# Altium PCB PCB1.PcbDoc (part 2 of 4)
Units mm, origin at the board's own origin, x right, y up, seen from the top; angles counter-clockwise.
Board outline 134.12 x 116.9 mm, 4 copper layers (Top Layer, Layer 1, Layer 2, Bottom Layer), stack 1.312 mm thick; 317 components, 155 nets, 807 pads, 898 vias.
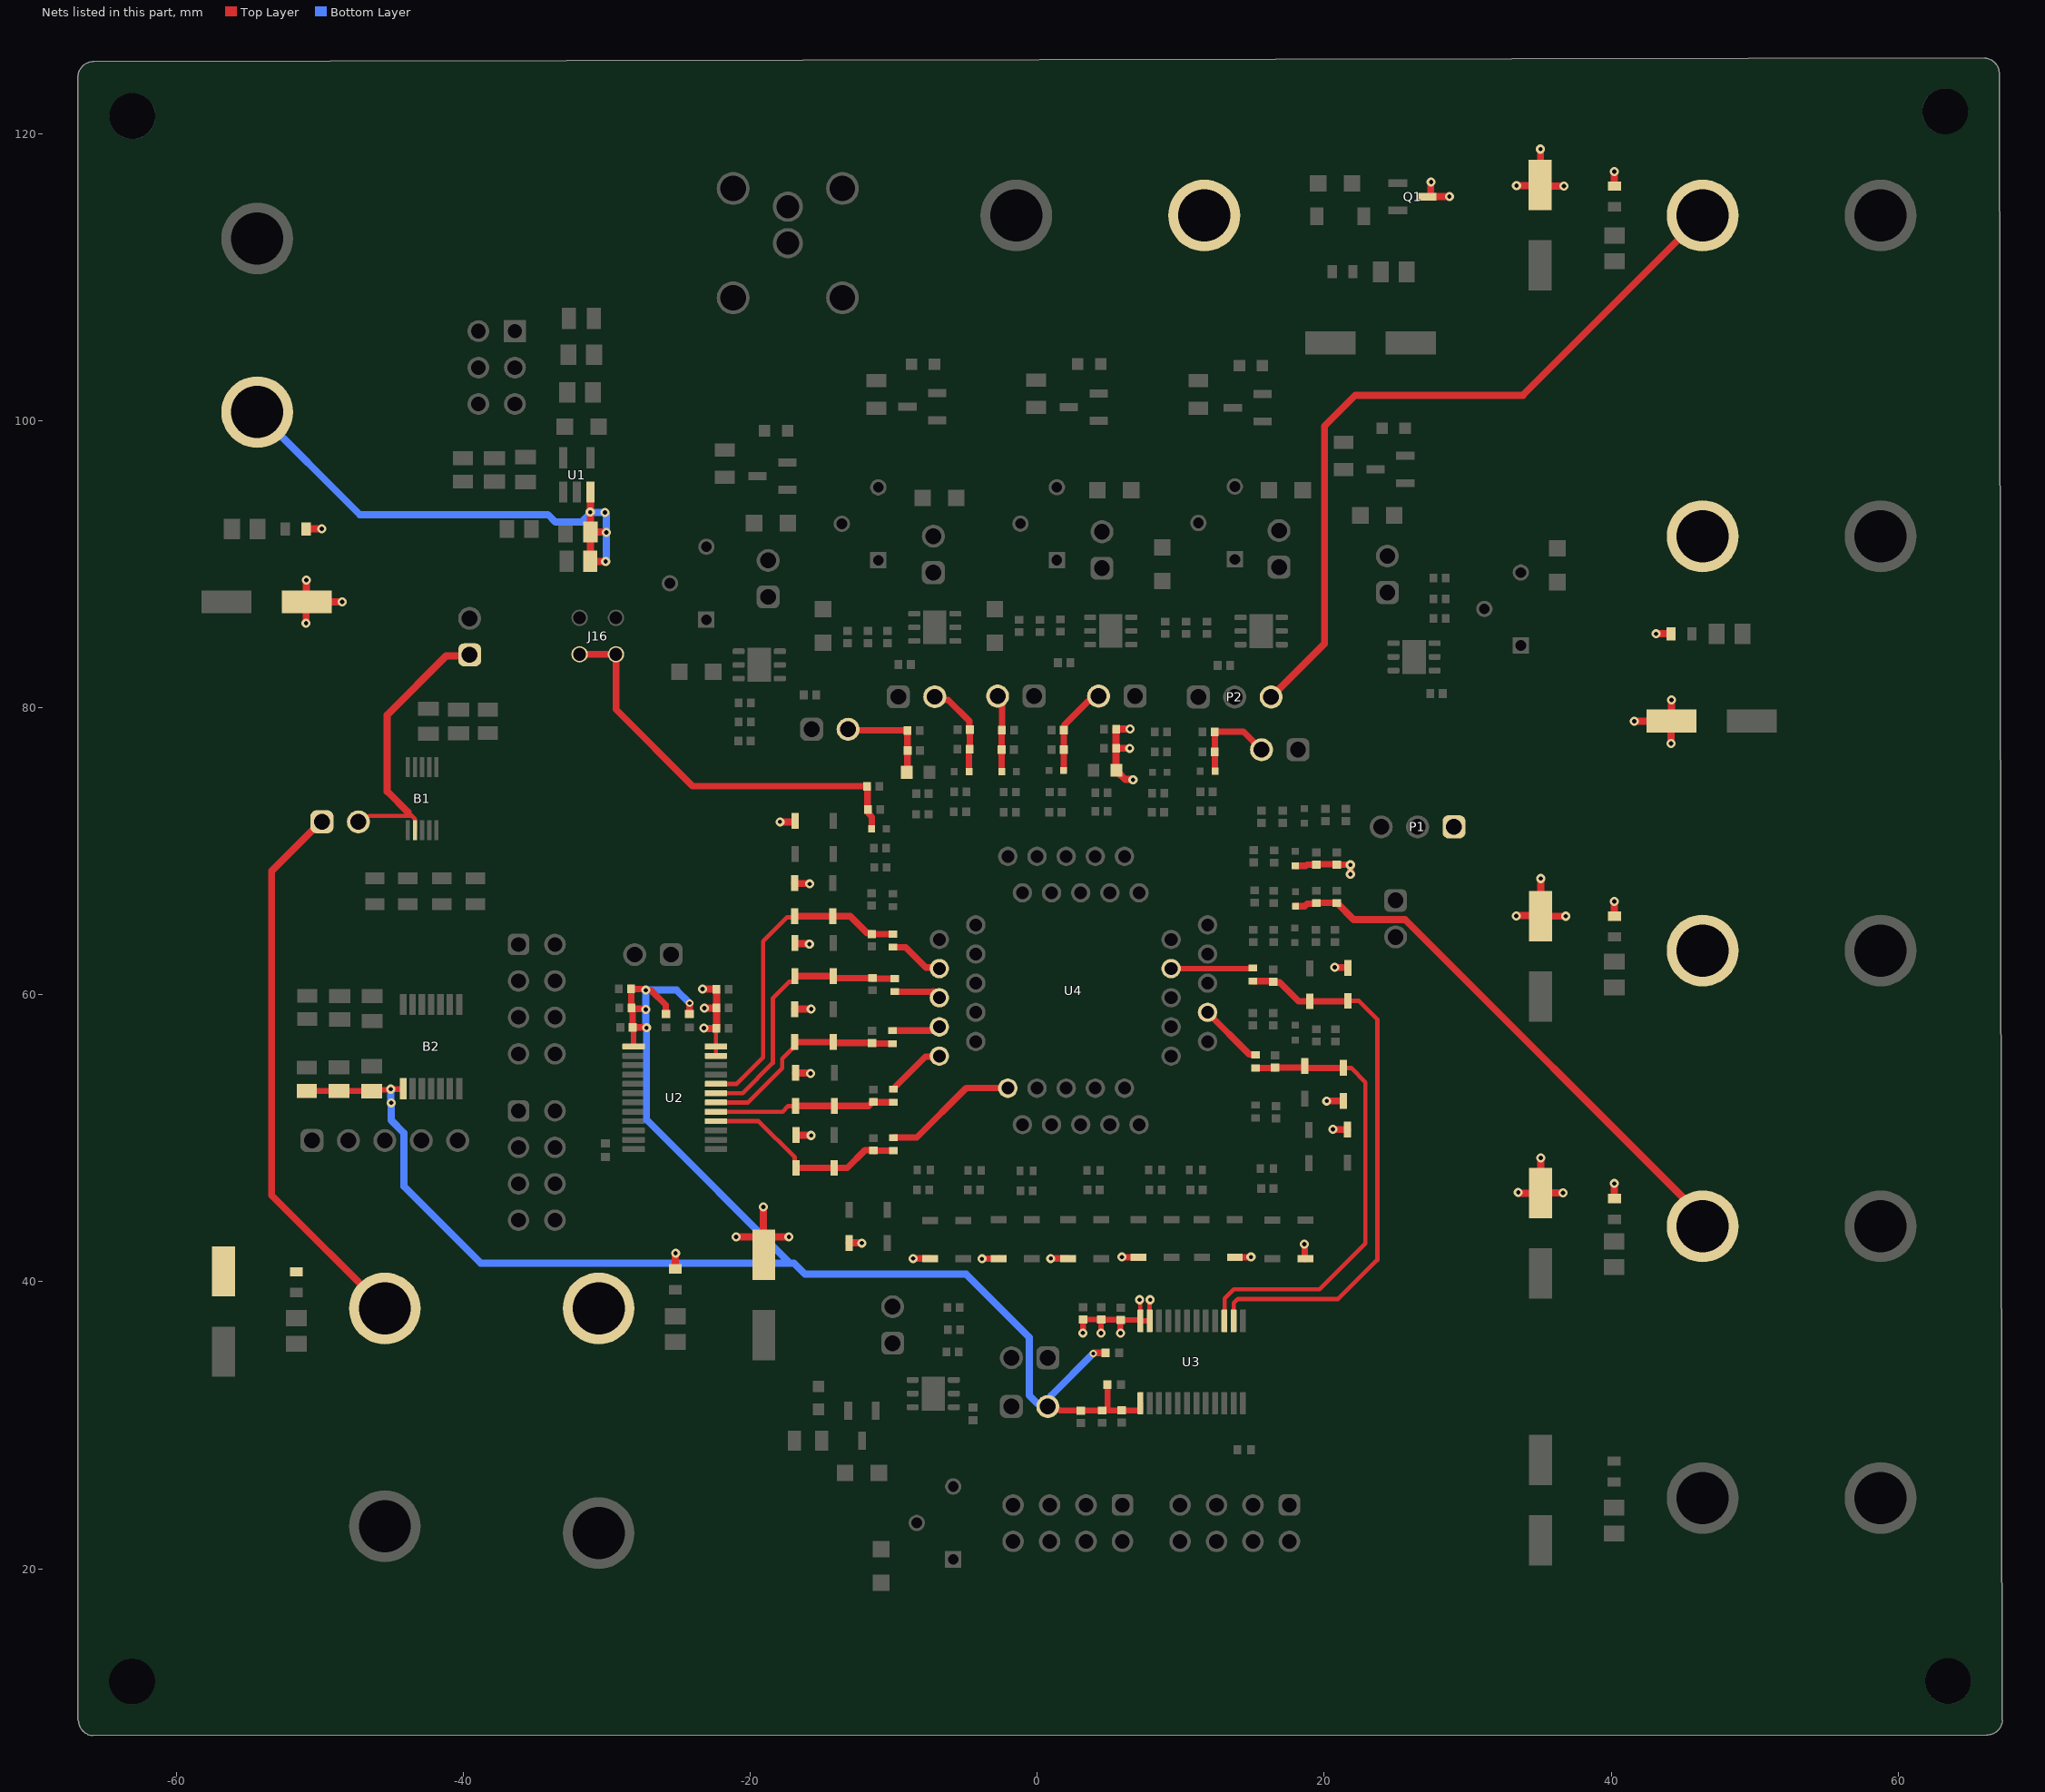
[diagram p4: the nets of this part, all layers, seen from the top]

## Part data
B1: "4 Channel, 500 ksps to 1 Msps, 12-Bit A/D Converter", Manufacturer_Name="Texas Instruments", Manufacturer_Part_Number=ADC124S101CIMM/NOPB, Mouser Part Number=926-AD124S101CIMMNPB, Datasheet Link=http://www.ti.com/lit/ds/symlink/adc124s101.pdf, Geometry.Height=1.1mm, Mouser Price/Stock=https://www.mouser.co.uk/ProductDetail/Texas-Instruments/ADC124S101CIMM-NOPB?qs=7X5t%252BdzoRHD7V7sCz8DzxQ%3D%3D
B2: "Voltage Level Translator Unidirectional 1 Circuit 4 Channel 200Mbps TSSOP-14", Manufacturer_Name="Texas Instruments", Mouser Part Number=595-TXU0304QPWRQ1, Datasheet Link=https://www.ti.com/lit/ds/symlink/txu0304-q1.pdf, Geometry.Height=1.2mm, Manufacturer_Part_Number=TXU0304QPWRQ1, Mouser Price/Stock=https://www.mouser.co.uk/ProductDetail/Texas-Instruments/TXU0304QPWRQ1?qs=QNEnbhJQKvZXfjMNvwmKIA%3D%3D
C1 C5 C8 C80 C81 C105: "100 pF +/-10% 1000V (1kV) Ceramic Capacitor C0G, NP0 0805 (2012 Metric)", Manufacturer_Name="Kyocera AVX", Mouser Part Number=581-0805CA101KAT2A, Datasheet Link=https://datasheets.kyocera-avx.com/AVX-HV_MLCC.pdf, Geometry.Height=0.94mm, Manufacturer_Part_Number=0805CA101KAT2A, Mouser Price/Stock=https://www.mouser.co.uk/ProductDetail/KYOCERA-AVX/0805CA101KAT2A?qs=ZBeOGGPQgEHtR%2FQeWT8jmQ%3D%3D
C2 C4 C7 C10 C11: "Multilayer Ceramic Capacitors MLCC - SMD/SMT 0805 0.1uF 50volts X7R 10%", Manufacturer_Name=Vishay, Mouser Part Number=77-VJ0805Y104KXAMR, Datasheet Link=http://www.vishay.com/docs/45226/vj31xrohsautomlcc.pdf, Geometry.Height=1.45mm, Manufacturer_Part_Number=VJ0805Y104KXAMR, Mouser Price/Stock=https://www.mouser.co.uk/ProductDetail/Vishay-Vitramon/VJ0805Y104KXAMR?qs=iPOr8XgPdiSpDWrmTedxnA%3D%3D
C3 C6 C9 C12: "1 µF ±10% 10V Ceramic Capacitor X7R 0805 (2012 Metric)", Manufacturer_Name=Vishay, Mouser Part Number=77-VJ0805Y105KXQTBC, Datasheet Link=https://www.vishay.com/docs/28548/vjw1bcbascomseries.pdf, Geometry.Height=1.35mm, Manufacturer_Part_Number=VJ0805Y105KXQTW1BC, Mouser Price/Stock=https://www.mouser.co.uk/ProductDetail/Vishay-Vitramon/VJ0805Y105KXQTW1BC?qs=F2lBERbFaaHnNHh23%2Flzkg%3D%3D
C13 C15 C30 C32 C56 C76 C77 C78 C103: "10 µF ±10% 16V Ceramic Capacitor X5R 0805 (2012 Metric)", Manufacturer_Name=Yageo, Copyright="Copyright (C) 2025 Ultra Librarian. All rights reserved.", Manufacturer_Part_Number=CC0805KRX5R7BB106
C14 C16 C31 C33 C57 C70 C75 C79 C104: library part WCAP-ASLI_6.3X5.5, "100 µF 16 V Aluminum Electrolytic Capacitors Radial, Can - SMD 2000 Hrs @ 105°C", Package=None, Availability=Unavailable, MF="{'manufacturer': u'W\xfcrth Elektronik'}", MP=865080343009, Price=None
C17 C18 C20 C21 C34 C36 C37 C38 C41 C42 C44 C45 C46 C48 C49 C50 C53 C54 C58 C59 C62 C63 C67 C68 C71 C72 C100 C101 C102 C106 C_U183 C_U283 C_U383 C_U483 C_U583 C_U683: "1 µF ±10% 10V Ceramic Capacitor X7S 0402 (1005 Metric)", Package="0402-2 VISHAY", Check_prices=https://www.snapeda.com/parts/VJ0402Y104KXXCW1BC/Vishay/view-part/?ref=eda, MF="Vishay Vitramon", MP=VJ0402Y104KXXCW1BC, SnapEDA_Link=https://www.snapeda.com/parts/VJ0402Y104KXXCW1BC/Vishay/view-part/?ref=snap
C19 C22 C25 C26 C29 C35 C39 C40 C43 C47 C51 C52 C55 C60 C69 C73 C86 C87 C88 C89 C90 C91 C92 C93 C94 C95 C96 C97 C98 C99 C_U184 C_U284 C_U384 C_U484 C_U584 C_U684: "0.1 ÂµF Â±10% 25V Ceramic Capacitor X7R 0402 (1005 Metric)", Package="0402-2 VISHAY", Check_prices=https://www.snapeda.com/parts/VJ0402Y104KXXCW1BC/Vishay/view-part/?ref=eda, MF="Vishay Vitramon", MP=VJ0402Y104KXXCW1BC, SnapEDA_Link=https://www.snapeda.com/parts/VJ0402Y104KXXCW1BC/Vishay/view-part/?ref=snap
C23 C24 C27 C28 C_U164 C_U165 C_U166 C_U167 C_U185 C_U264 C_U265 C_U266 C_U267 C_U285 C_U364 C_U365 C_U366 C_U367 C_U385 C_U464 C_U465 C_U466 C_U467 C_U485 C_U585 C_U685: "100 pF ±5% 100V Ceramic Capacitor C0G, NP0 0402 (1005 Metric)", Package=None, Availability=Unavailable, MF="{'manufacturer': u'KEMET'}", MP=C0402C101J1GACAUTO, Price=None
C61: "4.7 pF ±0.25pF 100V Ceramic Capacitor C0G, NP0 0805 (2012 Metric)", Manufacturer_Name=Yageo, Copyright="Copyright (C) 2026 Ultra Librarian. All rights reserved.", Manufacturer_Part_Number=CC0805CRNPO0BN4R7
C74: "22 pF ±5% 200V Ceramic Capacitor C0G, NP0 0805 (2012 Metric)", Manufacturer_Name=Yageo, Copyright="Copyright (C) 2026 Ultra Librarian. All rights reserved.", Manufacturer_Part_Number=CC0805JRNPOABN220
C_U182 C_U282 C_U382 C_U482 C_U582 C_U682: "SMD capacitor X5R(EIA) with capacitance 4.7uF Tol.20%. Rated voltage 6.3Vdc 85C", Package="1005 Taiyo Yuden", Check_prices=https://www.snapeda.com/parts/GRT155R60J475ME13J/Murata/view-part/?ref=eda, MF=Murata, MP=GRT155R60J475ME13J, SnapEDA_Link=https://www.snapeda.com/parts/GRT155R60J475ME13J/Murata/view-part/?ref=snap
D10: "Zener Diode 6.2 V 500 mW ±5% Surface Mount SOD-123", Package=None, Availability=Unavailable, MF="{'manufacturer': u'onsemi'}", MP=SZMMSZ5234BT1G, Price=None
D_U11 D_U12 D_U13 D_U14 D_U15 D_U16 D_U17 D_U18 D_U21 D_U22 D_U23 D_U24 D_U25 D_U26 D_U27 D_U28 D_U31 D_U32 D_U33 D_U34 D_U35 D_U36 D_U37 D_U38 D_U41 D_U42 D_U43 D_U44 D_U45 D_U46 D_U47 D_U48: "Small Signal Schottky Diodes", Manufacturer_Name=MCC, Mouser Part Number=833-BAT43WS-TP, Datasheet Link=https://www.mccsemi.com/pdf/Products/BAT42WS-BAT43WS(SOD-323).pdf, Geometry.Height=1.15mm, Manufacturer_Part_Number=BAT43WS-TP, Mouser Price/Stock=https://www.mouser.co.uk/ProductDetail/Micro-Commercial-Components-MCC/BAT43WS-TP?qs=Vo7e0yZOYdELUvvmcALzzg%3D%3D
D_U19 D_U29 D_U39 D_U49 D_U59 D_U69: "0603, Green Typ.(@20mA): 520nm, 430mcd, 3.2V, 140Â° InGaN", Package="0603 WÃ¼rth Elektronik", Check_prices=https://www.snapeda.com/parts/150060GS75000/Wurth+Electronics/view-part/?ref=eda, MF="Wurth Electronics", MP=150060GS75000, SnapEDA_Link=https://www.snapeda.com/parts/150060GS75000/Wurth+Electronics/view-part/?ref=snap
J1 J3 J28 J29 J30 J31 J_U126 J_U127 J_U226 J_U227 J_U326 J_U327 J_U426 J_U427 J_U526 J_U527 J_U626 J_U627: Package=None, Availability=Unavailable, Price=None
  J1: MF="{'manufacturer': u'W\xfcrth Elektronik'}", MP=61300511121
  J3 J28 J29 J30 J31 J_U126 J_U127 J_U226 J_U227 J_U326 J_U327 J_U426 J_U427 J_U526 J_U527 J_U626 J_U627: ComponentLink1Description="Digikey link", ComponentLink1URL=https://www.digikey.com/en/products/detail/w%C3%BCrth-elektronik/61300211121/4846823, MF="{'manufacturer': u'Wurth Electronics'}", MP=61300211121
J2: "Description", Manufacturer_Name="Cinch Connectivity Solutions", Copyright="Copyright (C) 2025 Ultra Librarian. All rights reserved.", Manufacturer_Part_Number=CBJ70, RefDes=RefDes, Type=Type
J4 J5 J10 J11 J12 J13 J14 J15 J17 J18 J19 J20 J21 J22 J23 J25 J32 J33: "Banana Jack Connector Miniature Solder", Manufacturer_Name="Keystone Electronics", Mouser Part Number=534-476-4, Datasheet Link=https://www.digikey.com/en/products/detail/keystone-electronics/476-4/318477, Geometry.Height=6.66mm, Manufacturer_Part_Number=476-4, Mouser Price/Stock=https://www.mouser.co.uk/ProductDetail/Keystone-Electronics/476-4?qs=w4ABFRoM%2FL8IE7UmBO5PGw%3D%3D
J6 J7 J8 J9: "WR-PHD 2.54 MM DUAL SOCKET HEADE", Package=None, Check_prices=https://www.snapeda.com/parts/61300821821/W%25C3%25BCrth+Elektronik+Midcom/view-part/?ref=eda, MF="WÃ¼rth Elektronik", MP=61300821821, SnapEDA_Link=https://www.snapeda.com/parts/61300821821/W%25C3%25BCrth+Elektronik+Midcom/view-part/?ref=snap
J16: "Connector Header Through Hole 4 position 0.100\" (2.54mm)", Manufacturer_Name=Sullins, Copyright="Copyright (C) 2026 Ultra Librarian. All rights reserved.", Manufacturer_Part_Number=PBC02DAAN, RefDes=RefDes, Type=Type
J24: "Connector Header Through Hole 6 position 0.100\" (2.54mm)", Manufacturer_Name="Amphenol ICC", Copyright="Copyright (C) 2025 Ultra Librarian. All rights reserved.", Manufacturer_Part_Number=67996-206HLF, RefDes=RefDes, Type=Type
P1 P2: "WR-PHD Pin Header, THT, Vertical, pitch 2.54mm, 1 Row, 3P", Contact Resistance=20mOhm, Manufacturer="Wurth Elektronik", Operating Temperature Max=105°C, Operating Temperature Min=-40°C, Rated Current=3A, Withstanding Voltage=500V, Working Voltage=250V, Category="Board-to-Board Connectors", ComponentLink1Description="Website Link", ComponentLink1URL=https://www.we-online.com/redexpert/article/61300311121?ad, ComponentLink2Description="Datasheet Link", ComponentLink2URL=https://www.we-online.com/redexpert/spec/61300311121?ad, Gender="Pin Header", Manufacturer Part Number=61300311121, Match Code=WR-PHD, Mount="Through Hole", Number of Pins=3, Number of Rows=1, Orientation=Vertical, Packaging=Bag, Pitch=2.54mm
Q1: "P-CHANNEL 40-V (D-S) MOSFET", Manufacturer_Name=Vishay, Copyright="Copyright (C) 2025 Ultra Librarian. All rights reserved.", Manufacturer_Part_Number=SQ2319CES-T1_GE3
Q_U12 Q_U22 Q_U32 Q_U42 Q_U52 Q_U62: "N-Channel 60 V 115mA (Ta) 200mW (Ta) Surface Mount SOT-23-3", Manufacturer_Name=onsemi, Copyright="Copyright (C) 2026 Ultra Librarian. All rights reserved.", Manufacturer_Part_Number=2N7002
R1 R_U131 R_U231 R_U331 R_U431 R_U531 R_U631: "RES SMD 300K OHM 0.1% 1/8W 0805", Package=None, Availability=Unavailable, ComponentLink1Description="Digikey link", ComponentLink1URL=https://www.digikey.com/en/products/detail/panasonic-industry/ERA-6AEB304V/1465808, MP=ERA6AEB304V, Price=None
R2: "20 Ohms ±0.5% 0.125W, 1/8W Chip Resistor 0805 (2012 Metric) Thin Film", Manufacturer_Name=Yageo, Copyright="Copyright (C) 2026 Ultra Librarian. All rights reserved.", Manufacturer_Part_Number=RT0805DRE0720RL
R3 R4 R5 R6: "RES 33 OHM 5% 1/8W 0805", Manufacturer_Name="Stackpole International", Copyright="Copyright (C) 2026 Ultra Librarian. All rights reserved.", Manufacturer_Part_Number=RMCF0805JT33R0
R8 R10 R11 R12 R13 R14 R15 R16 R18 R19 R20: "100 Ohms ±0.1% 0.063W, 1/16W Chip Resistor 0402 (1005 Metric) Automotive AEC-Q200 Thin Film", Package=None, Availability=Unavailable, MP=ERA2AEB101X, Price=None
R9 R17: "5 Ohms ±1% 0.4W Chip Resistor 0603 (1608 Metric) Automotive AEC-Q200, Current Sense Thin Film", Manufacturer_Name="Stackpole International", Copyright="Copyright (C) 2025 Ultra Librarian. All rights reserved.", Manufacturer_Part_Number=CSRT0603FT5R00, Type="Chip Resistor - Surface Mount"
R21 R22 R23 R24 R25 R26: "10 kOhms ±0.5% 0.063W, 1/16W Chip Resistor 0402 (1005 Metric) Automotive AEC-Q200 Thin Film", Package="0402 Yageo", Check_prices=https://www.snapeda.com/parts/RC0402FR-070RL/Yageo/view-part/?ref=eda, ComponentLink1Description="Digikey link", ComponentLink1URL=https://www.digikey.com/en/products/detail/panasonic-industry/ERA-2AED103X/1706126, MF=Yageo, MP=RC0402FR-070RL, SnapEDA_Link=https://www.snapeda.com/parts/RC0402FR-070RL/Yageo/view-part/?ref=snap
R33: "100 kOhms ±0.1% 0.125W, 1/8W Chip Resistor 0805 (2012 Metric) Automotive AEC-Q200 Thin Film", Package=None, Availability=Unavailable, MP=ERA6AEB104V, Price=None
R34 R35 R36 R37 R38 R39 R40 R41 R42: library part ERA3AEB201V, "200 Ohms ±0.1% 0.1W, 1/10W Chip Resistor 0603 (1608 Metric) Automotive AEC-Q200 Thin Film", Package=None, Availability=Unavailable, MP=ERA3AEB201V, Price=None
R_U17 R_U27 R_U37 R_U47 R_U57 R_U67: "RES SMD 20K OHM 0.1% 1/8W 0805", Package=None, Availability=Unavailable, ComponentLink1Description="Digikey link", ComponentLink1URL=https://www.digikey.com/en/products/detail/panasonic-industry/ERA-6AEB203V/1465780?_gl=1*16ggu6x*_up*MQ..*_gs*MQ..&gclid=CjwKCAjw6f3RBhApEiwAMaCqWWAys7UYOKri6355z56lT8wD9j8kH64REZKYwhM8W5opH-dHb2-LKxoC2UMQAvD_BwE&gclsrc=aw.ds&gbraid=0AAAAADrbLliUt3fRxN84rEH66mf2IHcf7, MP=ERA6AEB203V, Price=None
R_U127 R_U128 R_U129 R_U130 R_U227 R_U228 R_U229 R_U230 R_U327 R_U328 R_U329 R_U330 R_U427 R_U428 R_U429 R_U430: "1.5 kOhms ±0.5% 0.1W, 1/10W Chip Resistor 0402 (1005 Metric) Automotive AEC-Q200 Thin Film", Package=None, Availability=Unavailable, MP=RNCF0402DTE1K50, Price=None
R_U132 R_U232 R_U332 R_U432 R_U532 R_U632: "270 Ohms ±0.1% 0.125W, 1/8W Chip Resistor 0805 (2012 Metric) Thin Film", Package=None, Availability=Unavailable, MP=RT0805BRD07270RL, Price=None
R_U143 R_U243 R_U343 R_U443 R_U543 R_U643: "100 kOhms 0.5W, 1/2W PC Pins Through Hole Trimmer Potentiometer Cermet 25.0 Turn Top Adjustment", Package=None, Availability=Unavailable, MP=3296Y-1-104LF, Price=None
U1: "Precision, zero-crossover, 20-MHz, 0.9-pA Ib, RRIO, CMOS operational amplifier 5-SOT-23 -40 to 125", Manufacturer_Name="Texas Instruments", Copyright="Copyright (C) 2025 Ultra Librarian. All rights reserved.", Manufacturer_Part_Number=OPA320AIDBVT, RefDes=RefDes, Type=Type
U2 U3: "8-bit dual-supply bus transceiver", Package="TSSOP-24 Texas Instruments", Check_prices=https://www.snapeda.com/parts/SN74AXC8T245PWR/Texas+Instruments/view-part/?ref=eda, ComponentLink1Description="Digikey link", ComponentLink1URL=SN74AXC8T245PWR, MF="Texas Instruments", MP=SN74AXC8T245PWR, SnapEDA_Link=https://www.snapeda.com/parts/SN74AXC8T245PWR/Texas+Instruments/view-part/?ref=snap
U4: "40 Input/Output (I/O) and 1.02 Millimeter (mm) Pitch  / Lead Chip Carrier (LCC) Socket with Castellations (live-bug load)"
U_U12 U_U22 U_U32 U_U42 U_U52 U_U62: "Linear Voltage Regulator IC 1 Output 500mA 6-DFN _3x3_", Package="DFN-6 STMicroelectronics", ComponentLink1Description="Digikey link", ComponentLink1URL=https://www.digikey.com/en/products/detail/LD39050PUR/497-8717-1-ND/2039902, Digi-Key_Part_Number=497-8717-1-ND, Digi-Key_Purchase_URL=https://www.digikey.com/product-detail/en/stmicroelectronics/LD39050PUR/497-8717-1-ND/2039902?utm_source=snapeda&utm_medium=aggregator&utm_campaign=symbol, MF=STMicroelectronics, MP=LD39050PUR, SnapEDA_Link=https://www.snapeda.com/parts/LD39050PUR/STMicroelectronics/view-part/493713/?ref=snap

## Free pads (board coordinates)
  round 3.2 hole 3.2 mask-2539.97: 4(-63.075,12.15) 4(-63.05,121.225) 4(63.275,121.55) 4(63.475,12.175)

## Via types
v1: diameter 0.635, hole 0.305, Top Layer to Bottom Layer, 880 vias
v2: diameter 0.508, hole 0.254, Top Layer to Bottom Layer, 17 vias
v3: diameter 0.504, hole 0.254, Top Layer to Bottom Layer, 1 vias

## Nets (pads, with @x,y where several pads share a name; then routed paths per layer and width w, separated by ;. In a path a pad name is that pad's centre, name@x,y a point inside that pad or via, vN(x,y) a via of type N, cw(c..) or ccw(c..) an arc to the next point about the centre after c; other vN are vias at no path point)
+0.3V: C45.2 C46.2 C70.1 J14.1 R12.1 R38.2 | length 44.9
  Top Layer w0.45: R12.1@17.998,66.168 18.643,66.168 18.819,66.344 19.388,66.344 19.461,66.416 20.88,66.416 C45.2@20.88,66.414 ; C45.2@20.875,66.394 C45.2@20.925,66.344
  Top Layer w0.5: C45.2@20.875,66.394 20.9,66.394 22.064,65.23 25.645,65.23 46.225,44.65 J14.1@46.225,43.875 ; v1(33.525,46.225) 33.562,46.225 33.612,46.175 34.964,46.175 35.075,46.286 35.161,46.2 v1(36.65,46.2) ; C70.1@35.075,46.236 35.1,46.261 v1(35.1,48.625) ; v1(40.225,46.85) 40.225,45.85 R38.2@40.275,45.8
+0.05V: C2.2 C33.1 C105.2 J10.1 R36.2 U1.3 | length 45.3
  Top Layer w0.5: v1(-50.95,85.9) -50.95,87.35 C33.1@-50.925,87.375 ; R36.2@-50.95,92.375 -50.95,92.383 -50.871,92.462 -49.862,92.462 v1(-49.85,92.475) ; v1(-50.925,88.9) C33.1@-50.925,87.375 ; C33.1@-50.903,87.375 -48.475,87.375 v1@-48.45,87.4 ; C33.1@-50.85,87.275 -50.925,87.35 C33.1@-50.925,87.375 ; C33.1@-50.8,87.5 C33.1@-50.925,87.375 ; C2.2@-31.275,90.225 -31.25,90.2 C2.2@-31.155,90.2 v1(-30.075,90.2) ; C2.2@-31.225,90.3 -31.142,90.383 C105.2@-31.142,92.208 ; v1@-31.2,93.65 -31.165,93.65 -31.127,93.687 U1.3@-31.127,95.025 ; C105.2@-31.15,92.2 C105.2@-31.142,92.208 ; C105.2@-31.15,92.275 C105.2@-31.14,92.265 ; v1(-31.15,93.625) -31.14,93.615 C105.2@-31.14,92.265 ; C105.2@-31.13,92.25 C105.2@-31.14,92.24 ; v1(-30.025,92.225) -30.038,92.238 -31.113,92.238 C105.2@-31.14,92.265 ; C105.2@-31.142,92.208 -31.14,92.21 C105.2@-31.14,92.24 ; C105.2@-31.142,92.208 -31.142,92.238 C105.2@-31.14,92.24 ; C105.2@-31.14,92.24 C105.2@-31.14,92.265
  Bottom Layer w0.5: J10.1@-54.353,100.6 -47.213,93.46 -34.095,93.46 -33.568,92.932 -31.778,92.932 -31.176,93.534 -31.176,93.624 v1@-31.15,93.65 ; v1(-31.15,93.625) -31.138,93.613 -30.137,93.613 v1(-30.125,93.6) -30.125,93.563 -30.025,93.463 -30.025,90.3 v1@-30.05,90.275
  other v1: -48.425,87.375
+0.8V: C21.2 C24.2 C25.2 C28.2 C29.2 C34.2 C101.2 C104.1 C106.2 D_U11.1 D_U13.1 D_U15.1 D_U17.1 D_U21.1 D_U23.1 D_U25.1 D_U27.1 D_U31.1 D_U33.1 D_U35.1 D_U37.1 D_U41.1 D_U43.1 D_U45.1 D_U47.1 J13.1 R9.1 R42.2 U2.23 U2.24 U3.23 U3.24 | length 47.4
  Top Layer w0.3: U2.23@-22.386,55.745 -22.386,56.354 U2.24@-22.345,56.395 ; U2.24@-22.386,56.395 -22.386,57.616 C24.2@-22.352,57.65 ; v1(7.125,38.75) 7.189,38.686 7.189,38.011 U3.24@7.225,37.975 ; U3.23@7.825,37.95 7.825,38.7 v1(7.875,38.75)
  Top Layer w0.4: v1(3.184,36.44) 3.192,36.448 C106.2@3.192,37.387 ; C106.2@3.205,37.373 C29.2@4.45,37.373 ; C29.2@4.425,37.275 4.45,37.25 v1(4.45,36.425) ; C29.2@4.459,37.355 5.795,37.355 C28.2@5.775,37.375 ; v1(5.8,36.425) C28.2@5.8,37.35 ; C28.2@5.825,37.343 7.186,37.343 7.191,37.338 U3.24@7.191,37.28 U3.23@7.841,37.28
  Top Layer w0.45: v1(-8.65,41.625) D_U23.1@-7.45,41.625 ; v1(-3.85,41.6) -3.838,41.612 -2.693,41.612 D_U31.1@-2.681,41.625 ; v1(0.95,41.625) D_U35.1@2.15,41.625 ; v1@5.925,41.7 D_U37.1@7.066,41.7 ; D_U33.1@13.775,41.7 v1@14.875,41.7 ; D_U11.1@18.651,41.6 v1@18.651,42.599
  Top Layer w0.5: R42.2@-25.225,40.9 -25.212,40.912 -25.212,41.988 v1(-25.2,42) ; v1(-23.325,60.4) C101.2@-22.391,60.4 ; v1@-23.275,57.725 v1(-23.225,57.675) -23.2,57.65 C24.2@-22.352,57.65 ; v1@-23.15,59.125 -23.1,59.075 C25.2@-22.352,59.075 ; C25.2@-22.375,59.125 -22.335,59.125 C101.2@-22.335,60.375 ; C24.2@-22.33,57.655 C25.2@-22.33,59.075 ; v1(-20.975,43.125) -19.35,43.125 -19.075,42.85 v1(-19.075,45.225) ; C104.1@-18.925,42.7 -18.5,43.125 v1(-17.3,43.125) ; v1(-17.925,72.05) -16.864,72.05 D_U41.1@-16.864,71.94 ; D_U47.1@-16.91,59.003 -16.91,59.002 -15.752,59.002 v1(-15.75,59) ; D_U45.1@-16.899,67.776 -16.899,67.75 -15.875,67.75 v1(-15.85,67.725) ; D_U43.1@-16.889,63.601 -16.889,63.551 -15.901,63.551 v1(-15.875,63.525) ; D_U21.1@-16.835,54.558 -16.835,54.542 -15.817,54.542 v1(-15.8,54.525) ; D_U25.1@-16.795,50.24 -16.795,50.22 -15.77,50.22 v1(-15.75,50.2) ; D_U27.1@-13.113,42.716 -13.113,42.708 -12.233,42.708 v1(-12.225,42.7) ; C21.2@5.486,77.221 5.486,78.486 5.512,78.512 6.463,78.512 v1(6.475,78.525) ; R9.1@5.5,75.675 C21.2@5.5,77.175 ; C21.2@5.525,77.188 5.525,77.175 v1(6.45,77.175) ; R9.1@5.653,75.484 6.136,75.001 6.649,75.001 v1(6.675,74.975) ; v1(5.9,41.725) v1@5.925,41.7 ; v1@14.875,41.7 v1(14.9,41.725) ; v1(18.625,42.625) v1@18.651,42.599 ; D_U11.1@18.651,41.6 D_U11.1@18.683,41.6 ; v1(20.175,52.601) D_U13.1@21.325,52.601 ; v1(20.6,50.625) 20.613,50.612 21.625,50.612 D_U15.1@21.625,50.6 ; v1(20.725,61.925) 20.75,61.9 21.65,61.9 D_U17.1@21.65,62.07
  other v1: -23.2,59.075
+1.5V: C62.2 C63.2 J_U526.2 R18.1 | length 6.4
  Top Layer w0.45: C63.2@1.849,77.073 C62.2@1.849,78.438 1.874,78.463 1.874,78.774 3.702,80.602 4.067,80.602 J_U526.2@4.277,80.812 ; R18.1@1.85,75.625 C63.2@1.85,77.073
+1.8V: C36.2 C58.2 J_U326.2 R17.1 | length 6.9
  Top Layer w0.45: J_U326.2@-13.073,78.423 C58.2@-9.043,78.423 C36.2@-9.043,77.001 ; R17.1@-9.1,75.5 -9.043,75.557 C36.2@-9.043,76.876
+2.6V: C37.2 C38.2 J_U226.2 R10.1 | length 6.5
  Top Layer w0.45: C37.2@12.338,78.325 14.38,78.325 J_U226.2@15.63,77.075 ; C38.2@12.374,76.922 C37.2@12.374,78.3 ; R10.1@12.387,75.575 C38.2@12.387,76.91
+3.3V: B2.1 C9.2 C10.2 C22.2 C23.2 C26.2 C27.2 C80.2 C100.2 C102.2 J_U626.2 R21.1 R22.1 R23.1 R24.1 U2.1 U3.1 | length 118.9
  Top Layer w0.4: C9.2@-50.905,53.298 C10.2@-48.656,53.297 ; C10.2@-48.656,53.297 -48.65,53.291 -46.377,53.291 -46.289,53.38 -45.095,53.38 v1(-45.05,53.425) -44.208,53.425 B2.1@-44.183,53.45 ; U2.1@-28.126,56.395 C23.2@-28.126,57.44 ; J_U626.2@0.741,31.315 0.951,31.105 1.518,31.105 1.584,31.039 C102.2@3.061,31.039 ; C102.2@3.066,31.039 4.897,31.039 ; R22.1@4.897,32.842 4.897,31.039 ; U3.1@7.191,31.54 7.191,31.044 7.186,31.039 4.897,31.039
  Top Layer w0.45: C100.2@-28.3,60.475 -28.3,60.447 -28.253,60.4 -27.4,60.4 -27.325,60.325 v1(-27.275,60.325) -27.24,60.29 -26.89,60.29 -25.892,59.292 -25.892,58.687 R21.1@-25.875,58.67 ; C22.2@-28.291,59.069 C100.2@-28.291,60.425 ; C22.2@-28.273,59.075 -28.273,59.05 -28.248,59.025 -28.248,58.829 -28.198,58.779 C23.2@-28.198,57.725 -27.25,57.725 v1(-27.225,57.7) ; C22.2@-28.248,59.026 -27.376,59.026 -27.325,58.975 v1(-27.275,58.975)
  Top Layer w0.5: R23.1@-24.24,58.664 -24.225,58.68 -24.225,59.411 v2(-24.223,59.412) ; v2(3.9,35) 3.902,35 3.951,35.049 4.735,35.049 4.737,35.047 R24.1@4.765,35.047
  Bottom Layer w0.5: v1(-45.05,53.425) -45.037,53.413 -45.037,52.487 v1(-45.025,52.475) -45.025,51.262 -44.125,50.362 -44.125,46.65 -38.776,41.301 -25.515,41.301 -25.497,41.283 -24.903,41.283 -24.885,41.301 -17.226,41.301 ; v1@-27.275,58.938 -27.275,57.908 -27.251,57.883 -27.251,57.726 v1(-27.225,57.7) -27.225,51.3 -17.226,41.301 ; v1(-27.275,58.975) v1(-27.275,60.325) -25.136,60.325 v2(-24.223,59.412) ; v2@3.898,34.998 0.951,32.051 0.951,31.525 J_U626.2@0.741,31.315 0.531,31.525 0.006,31.525 -0.55,32.081 -0.55,36.125 -4.95,40.525 -16.175,40.525 -16.951,41.301 -17.226,41.301
+5V-Unfiltered: J5.1 Q1.3 | length 2.4
  Top Layer w0.5: v1(27.45,116.625) 27.424,116.599 27.424,115.621 27.404,115.6 27.416,115.612 28.712,115.612 v1(28.725,115.625)
+6V: C31.1 J4.1 P1.1 R35.2 | length 7.1
  Top Layer w0.5: v1@41.55,79.075 41.575,79.05 v1(41.6,79.05) C31.1@44.175,79.05 ; v1(43.125,85.15) 44.15,85.15 R35.2@44.175,85.125 ; C31.1@44.15,79.15 44.175,79.125 C31.1@44.175,79.05 ; v1(44.175,77.5) C31.1@44.175,79.05 ; C31.1@44.2,78.875 C31.1@44.2,79.075 ; v1(44.2,80.55) C31.1@44.2,79.075 ; C31.1@44.175,79.05 C31.1@44.2,79.075
+VDD_ERS: C67.2 C72.2 J_U426.2 R20.1 | length 5.4
  Top Layer w0.45: J_U426.2@-2.76,80.812 -2.76,80.515 -2.45,80.205 C67.2@-2.45,78.438 ; R20.1@-2.474,75.55 C72.2@-2.474,77.109 ; C72.2@-2.474,77.08 C67.2@-2.474,78.438
+VDD_HS: C59.2 C71.2 J_U126.2 R16.1 | length 6.7
  Top Layer w0.45: J_U126.2@-7.141,80.765 -6.921,80.545 -6.207,80.545 -4.733,79.071 -4.733,78.518 C71.2@-4.694,78.48 ; R16.1@-4.75,75.55 -4.75,77.075 C59.2@-4.7,77.125 C71.2@-4.7,78.474
-0.2V: C41.2 C42.2 C57.1 J12.1 R11.1 R37.2 | length 11.7
  Top Layer w0.45: R11.1@17.982,68.988 18.713,68.988 18.793,69.068 C42.2@19.46,69.068 ; C42.2@19.46,69.09 20.86,69.09 20.875,69.09 C41.2@20.889,69.076 ; C41.2@20.919,69.046 C41.2@20.889,69.076 ; v1@21.799,69.076 C41.2@20.889,69.076 ; v1(21.825,68.4) v1(21.825,69.05)
  Top Layer w0.5: C41.2@20.86,69.09 20.874,69.076 C41.2@20.889,69.076 ; v1@21.799,69.076 v1(21.825,69.05) v1@21.8,69.075 ; v1(33.375,65.5) 33.4,65.525 35.075,65.525 35.1,65.55 v1(35.1,68.1) ; C57.1@35.075,65.48 35.08,65.475 v1(36.825,65.475) ; R37.2@40.225,65.48 v1(40.225,66.5)
-2V: C79.1 J11.1 P2.3 R41.2 | length 59.8
  Top Layer w0.5: P2.3@16.301,80.749 20.025,84.473 20.025,99.625 22.175,101.775 33.851,101.775 J11.1@46.375,114.299 ; v1(33.4,116.375) 35.05,116.375 C79.1@35.075,116.35 ; v1(35.075,118.925) C79.1@35.075,116.35 ; v1(36.7,116.35) C79.1@35.075,116.35 ; v1(40.225,117.35) 40.227,117.348 40.227,116.348 R41.2@40.275,116.3
ADC_EXT: C14.1 J15.1 J28.1 R39.2 | length 38.7
  Top Layer w0.5: J28.1@-49.875,72.1 -53.35,68.625 -53.35,46.032 J15.1@-45.463,38.145
ADC_IN: B1.7 J28.2 J29.1 | length 20.2
  Top Layer w0.3: J28.2@-47.45,72.075 -46.928,72.075 -46.539,72.465 -43.589,72.465 ; -43.849,72.725 -43.589,72.465 ; B1.7@-43.363,71.465 -43.363,72.239 -43.589,72.465
  Top Layer w0.5: -43.85,72.725 -45.293,74.167 -45.293,79.507 -41.192,83.608 -39.642,83.608 J29.1@-39.625,83.625
ANALOG_OUT: C48.2 C49.2 J16.2 J16.4 R13.1 | length 29.2
  Top Layer w0.3: C49.2@-11.85,74.525 C49.2@-11.826,74.501 ; C48.2@-11.826,72.901 C48.2@-11.775,72.85
  Top Layer w0.45: J16.2@-31.89,83.725 J16.4@-29.35,83.725 -29.35,79.875 -24,74.525 C49.2@-11.85,74.525 ; C48.2@-11.826,72.901 C49.2@-11.826,74.501 ; C48.2@-11.802,72.9 -11.752,72.85 -11.752,72.627 -11.598,72.473 -11.598,72.445 -11.537,72.384 R13.1@-11.537,71.575
BL0: C_U465.2 D_U43.2 D_U44.1 R_U428.1 U2.19 | length 18.8
  Top Layer w0.3: U2.19@-22.386,53.145 -20.53,53.145 -18.425,55.25 -18.425,59.765 -17.289,60.901 -16.989,60.901 -16.889,61.001 D_U43.2@-16.889,61.301
  Top Layer w0.45: D_U43.2@-16.889,61.301 D_U44.1@-14.22,61.301 -14.22,61.19 -14.195,61.165 C_U465.2@-11.464,61.165 ; C_U465.2@-11.459,61.138 R_U428.1@-9.938,61.138
  Top Layer w0.5: C_U465.2@-11.464,61.143 C_U465.2@-11.459,61.138
BL0-SAFE: R_U428.2 U4.11 | length 3.3
  Top Layer w0.45: R_U428.2@-9.933,60.219 U4.11@-7.25,60.219
  Top Layer w0.5: U4.11@-7.25,60.219 U4.11@-6.823,59.792
BL1: C_U467.2 D_U47.2 D_U48.1 R_U430.1 U2.18 | length 14.7
  Top Layer w0.3: U2.18@-22.386,52.495 -20.155,52.495 -17.775,54.875 -17.775,55.538 -16.91,56.403 D_U47.2@-16.91,56.703
  Top Layer w0.45: D_U47.2@-16.91,56.703 D_U48.1@-14.21,56.703 ; D_U48.1@-14.21,56.651 C_U467.2@-11.5,56.651 ; C_U467.2@-11.5,56.629 -11.464,56.593 R_U430.1@-10.075,56.593
  Top Layer w0.5: D_U48.1@-14.21,56.651 D_U48.1@-14.21,56.703
BL1-SAFE: R_U430.2 U4.13 | length 3.4
  Top Layer w0.45: R_U430.2@-10.075,57.507 -7.32,57.507 -7.067,57.76 U4.13@-6.823,57.76
BL2: C_U264.2 D_U21.2 D_U22.1 R_U227.1 U2.17 | length 12.2
  Top Layer w0.3: U2.17@-21.936,51.845 -17.755,51.845 -17.359,52.241 -16.852,52.241 D_U21.2@-16.835,52.258
  Top Layer w0.45: D_U21.2@-16.835,52.258 D_U22.1@-14.134,52.258 -11.742,52.258 C_U264.2@-11.43,52.57 ; C_U264.2@-11.356,52.506 R_U227.1@-10.015,52.506
  Top Layer w0.5: C_U264.2@-11.43,52.57 C_U264.2@-11.425,52.57 ; C_U264.2@-11.42,52.57 C_U264.2@-11.356,52.506
BL2-SAFE: R_U227.2 U4.15 | length 4.2
  Top Layer w0.45: R_U227.2@-10.015,53.42 -9.96,53.42 -9.94,53.44 -9.94,53.535 -7.79,55.685 -6.866,55.685 U4.15@-6.823,55.728
BL3: C_U266.2 D_U25.2 D_U26.1 R_U229.1 U2.16 | length 14.6
  Top Layer w0.3: U2.16@-22.386,51.195 -19.42,51.195 -16.895,48.67 -16.895,48.04 D_U25.2@-16.795,47.94
  Top Layer w0.45: D_U25.2@-16.795,47.94 D_U26.1@-14.141,47.94 -13.228,47.94 -11.985,49.182 C_U266.2@-11.429,49.182 ; C_U266.2@-11.368,49.134 R_U229.1@-10.015,49.134
  Top Layer w0.5: C_U266.2@-11.429,49.182 C_U266.2@-11.425,49.186 ; C_U266.2@-11.42,49.186 C_U266.2@-11.368,49.134
BL3-SAFE: R_U229.2 U4.16 | length 9.4
  Top Layer w0.45: R_U229.2@-10.015,50.048 -8.402,50.048 -4.957,53.493 U4.16@-2.048,53.493
BL_MODE_1: C_U165.2 D_U13.2 D_U14.1 R_U128.1 U3.15 | length 32.7
  Top Layer w0.3: U3.15@13.041,37.28 13.058,37.297 13.058,38.833 13.7,39.475 19.675,39.475 22.875,42.675 22.875,53.9 21.874,54.901 D_U13.2@21.325,54.901
  Top Layer w0.45: R_U128.1@15.23,54.905 C_U165.2@16.57,54.905 ; C_U165.2@16.575,54.925 D_U14.1@18.65,54.925 ; D_U14.1@18.655,54.901 D_U13.2@21.325,54.901
  Top Layer w0.5: C_U165.2@16.57,54.905 C_U165.2@16.575,54.9 ; D_U14.1@18.65,54.925 D_U14.1@18.655,54.93 ; D_U14.1@18.655,54.901 D_U14.1@18.655,54.93 ; D_U14.1@18.655,55.295 D_U14.1@18.655,55.05 D_U14.1@18.655,54.93 ; D_U14.1@18.675,54.95 D_U14.1@18.655,54.93
BL_MODE_1-SAFE: R_U128.2 U4.29 | length 4.6
  Top Layer w0.45: U4.29@11.839,58.794 14.799,55.834 15.205,55.834 R_U128.2@15.225,55.814
BL_MODE_2: C_U167.2 D_U17.2 D_U18.1 R_U130.1 U3.14 | length 39.2
  Top Layer w0.3: U3.14@13.691,37.28 13.691,38.515 13.976,38.8 20.975,38.8 23.7,41.525 23.7,58.3 22.425,59.575 D_U17.2@21.65,59.575
  Top Layer w0.45: R_U130.1@15.02,60.951 16.392,60.951 C_U167.2@16.435,60.908 ; C_U167.2@16.485,60.88 16.507,60.858 16.91,60.858 18.223,59.545 D_U17.2@21.65,59.545
  Top Layer w0.5: D_U17.2@21.65,59.545 D_U17.2@21.65,59.77
BL_MODE_2-SAFE: R_U130.2 U4.32 | length 5.7
  Top Layer w0.38: U4.32@9.331,61.824 14.979,61.824 R_U130.2@15.02,61.865
BLINPUT: C_U466.2 D_U45.2 D_U46.1 R_U429.1 U2.20 | length 22.4
  Top Layer w0.3: U2.20@-22.386,53.795 -20.93,53.795 -19.1,55.625 -19.1,63.726 -17.423,65.403 -16.972,65.403 D_U45.2@-16.899,65.476
  Top Layer w0.45: D_U45.2@-16.899,65.476 D_U46.1@-14.25,65.476 -13.026,65.476 -11.827,64.277 -11.575,64.277 C_U466.2@-11.525,64.227 R_U429.1@-10.064,64.227
BLINPUT-SAFE: R_U429.2 U4.9 | length 3.8
  Top Layer w0.45: R_U429.2@-10.059,63.318 -10.039,63.298 -9.148,63.298 -7.753,61.903 -6.916,61.903 U4.9@-6.84,61.826